# Altium PCB Grabber.PCBDOC (part 5 of 5)
Units mm, origin at the board's own origin, x right, y up, seen from the top; angles counter-clockwise.
Board outline 72.5 x 100 mm, 4 copper layers (TopLayer, Internal Plane 2, Layer 1, Bottom Layer), stack 1.543 mm thick; 160 components, 116 nets, 692 pads, 242 vias.
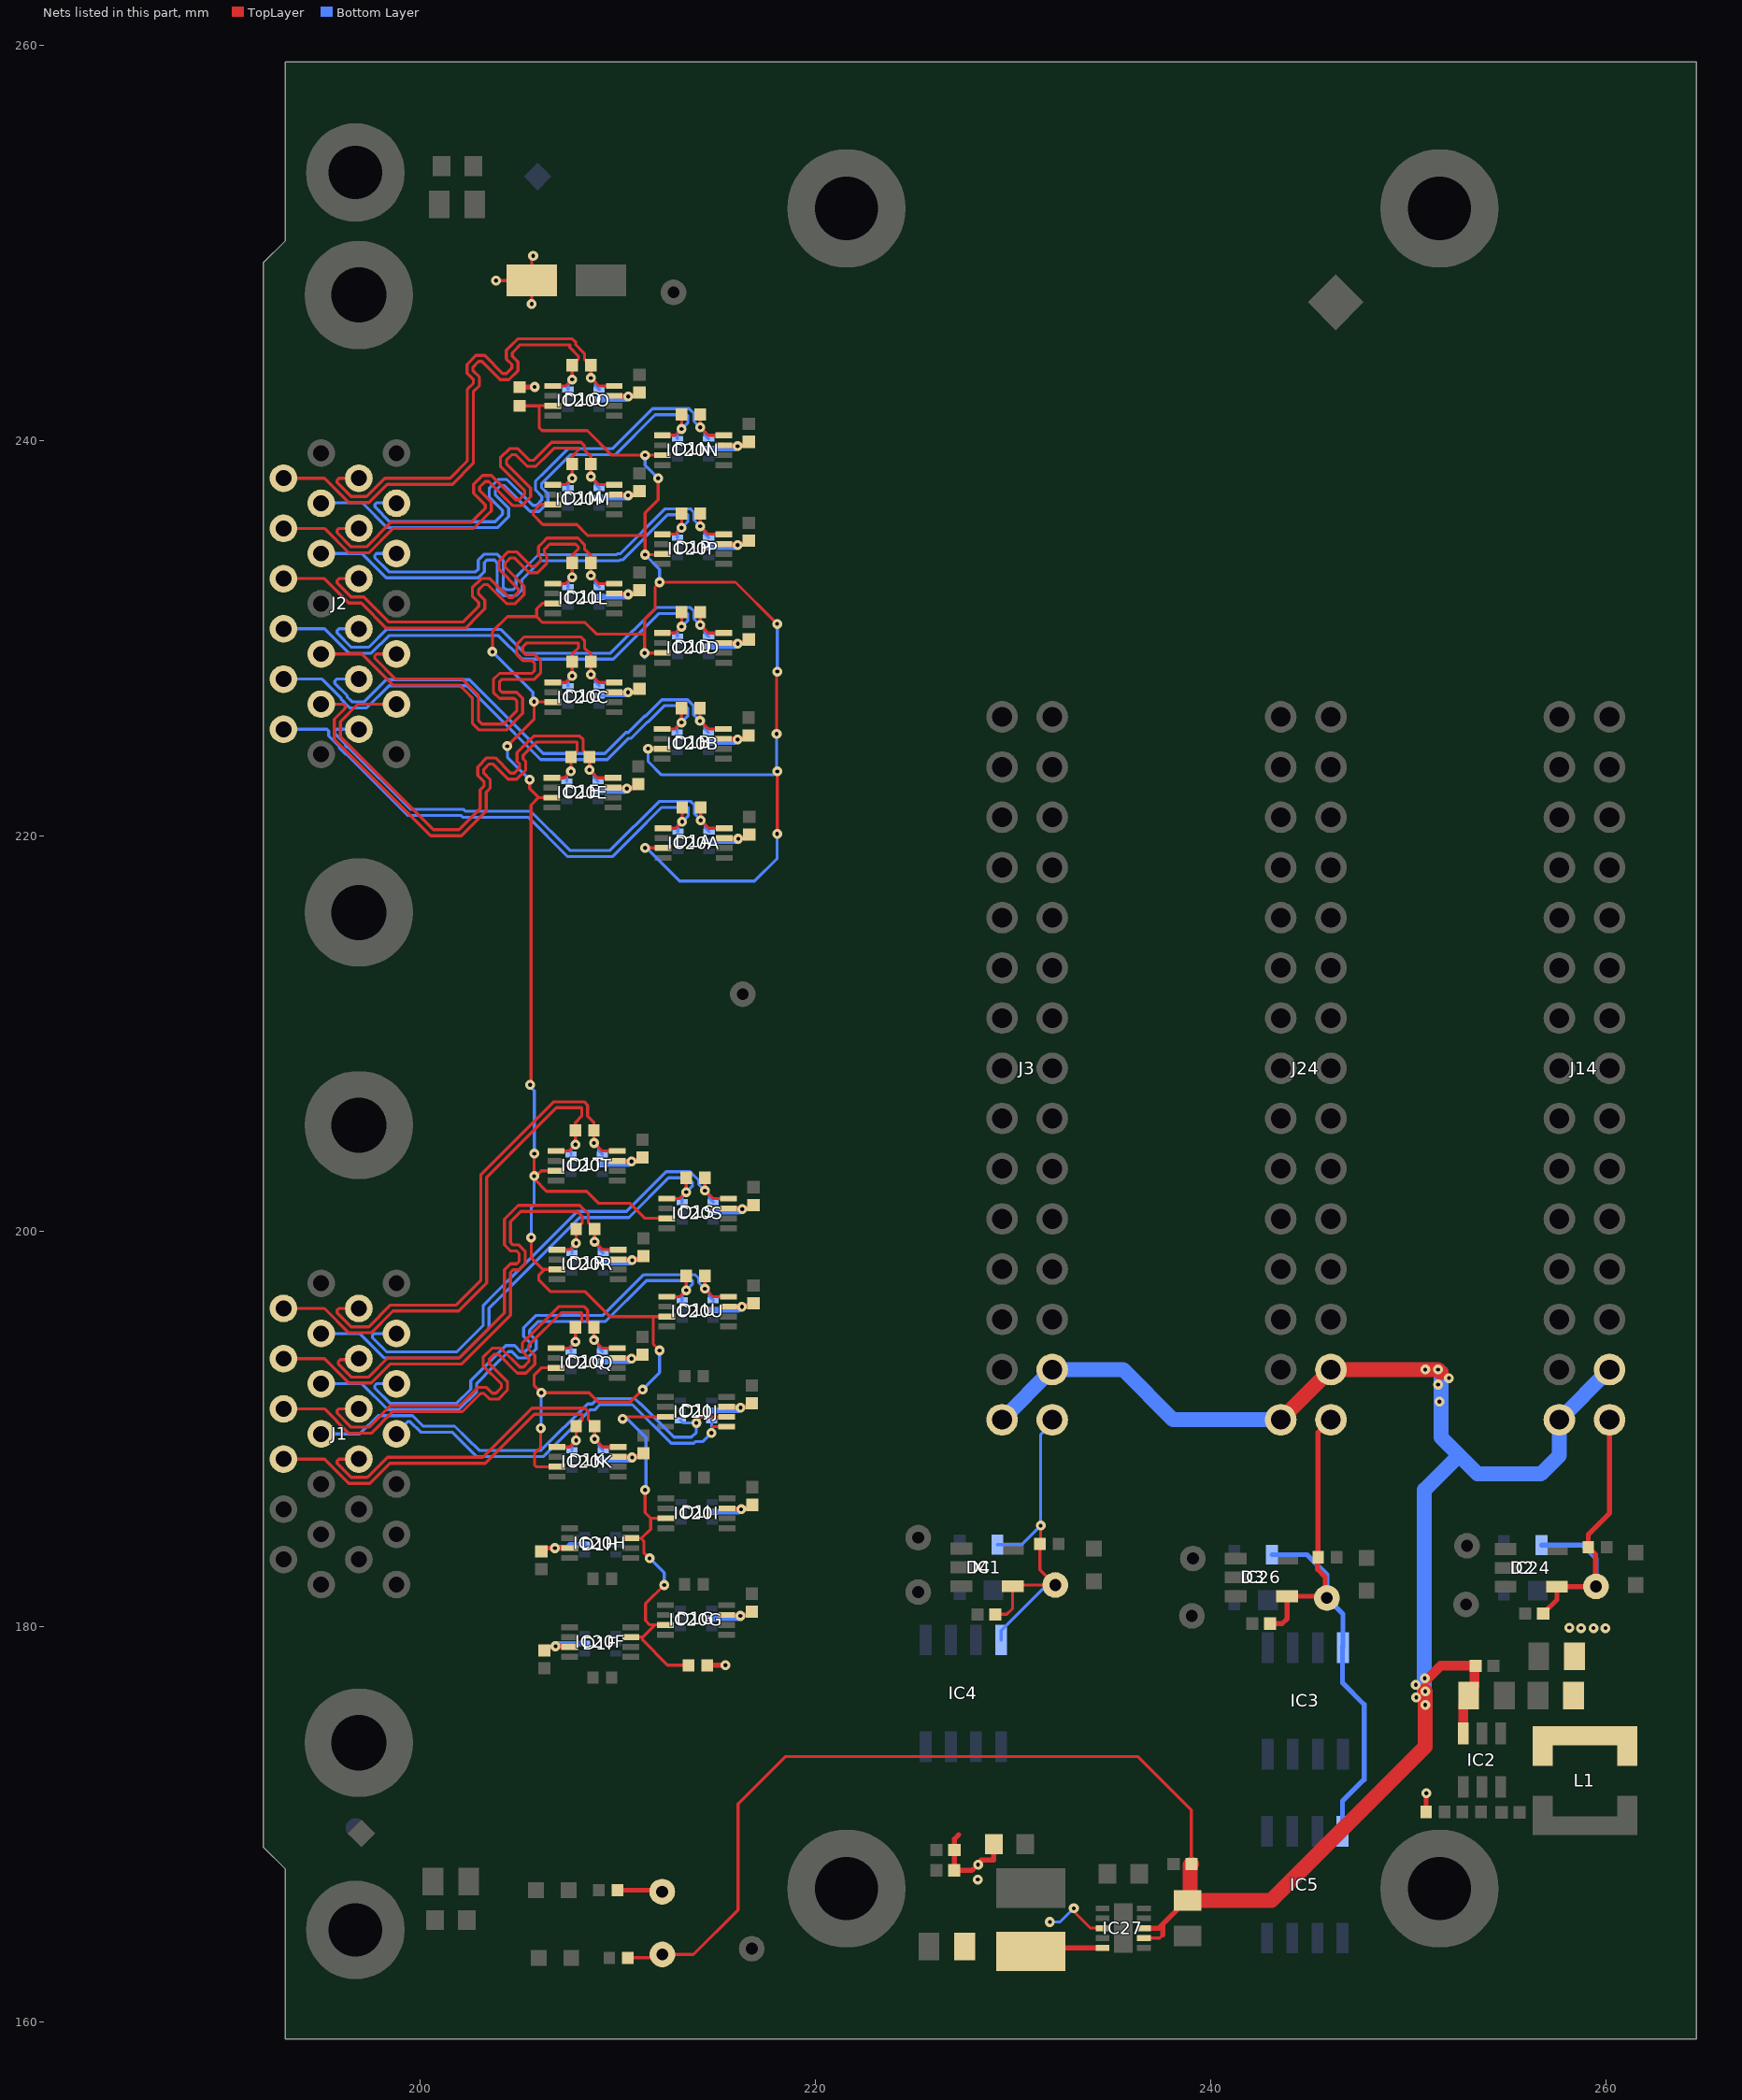
[diagram p6: the nets of this part, all layers, seen from the top]

## Via types
v1: diameter 0.5, hole 0.2, TopLayer to Bottom Layer, tented both sides, 242 vias

## Nets (pads, with @x,y where several pads share a name; then routed paths per layer and width w, separated by ;. In a path a pad name is that pad's centre, name@x,y a point inside that pad or via, vN(x,y) a via of type N, cw(c..) or ccw(c..) an arc to the next point about the centre after c; other vN are vias at no path point) (continued)
P3V3: B10.1 C7.2 C8.2 C47A.2 C47B.2 C47C.2 C47D.2 C47E.2 C47F.2 C47G.2 C47H.2 C47I.2 C47J.2 C47K.2 C47L.2 C47M.2 C47N.2 C47O.2 C47P.2 C47Q.2 C47R.2 C47S.2 C47T.2 C47U.2 C59.2 C62.1 C65.2 C66.2 D1A.5 D1B.5 D1C.5 D1D.5 D1E.5 D1F.5 D1G.5 D1H.5 D1I.5 D1J.5 D1K.5 D1L.5 D1M.5 D1N.5 D1O.5 D1P.5 D1Q.5 D1R.5 D1S.5 D1T.5 D1U.5 IC20A.7 IC20B.7 IC20C.7 IC20D.7 IC20E.7 IC20F.7 IC20G.7 IC20H.7 IC20I.7 IC20J.7 IC20K.7 IC20L.7 IC20M.7 IC20N.7 IC20O.7 IC20P.7 IC20Q.7 IC20R.7 IC20S.7 IC20T.7 IC20U.7 IC27.8 IC27.10 L1.2 L2.2 R2.1 R8.1 R9.1 R10.2 R121.2 | length 82.2
  TopLayer w0.152: v1(203.866,248.107) C62.1@205.666,248.107 ; v1(205.666,246.924) C62.1@205.666,248.107 ; v1(205.74,249.357) 205.666,249.284 C62.1@205.666,248.107 ; IC20C.7@209.842,227.273 209.844,227.275 210.539,227.275 v1(210.541,227.276) 210.94,227.276 210.942,227.273 C47C.2@211.117,227.448 ; v1(233.092,165.756) 233.092,165.607 233.942,164.756 IC27.8@234.542,164.756
  TopLayer w0.254: R8.1@205.054,242.71 205.803,242.71 v1(205.816,242.723) ; C47H.2@206.154,183.82 206.314,183.98 v1(206.838,183.98) IC20H.7@207.551,183.98 ; C47F.2@206.31,178.805 206.485,178.98 206.485,178.976 206.493,178.968 206.826,178.968 v1(206.873,179.015) 206.89,178.998 207.568,178.998 IC20F.7@207.585,178.98 ; IC20E.7@209.777,222.448 209.8,222.425 210.455,222.425 v1(210.478,222.402) 210.525,222.449 210.876,222.449 210.877,222.448 C47E.2@211.052,222.623 ; IC20L.7@209.842,232.273 209.865,232.25 210.52,232.25 v1(210.543,232.227) 210.59,232.274 210.941,232.274 210.942,232.273 C47L.2@211.117,232.448 ; IC20M.7@209.842,237.28 209.865,237.257 210.52,237.257 v1(210.543,237.234) 210.59,237.281 210.941,237.281 210.942,237.28 C47M.2@211.117,237.455 ; IC20O.7@209.842,242.273 209.86,242.256 210.538,242.256 v1(210.555,242.239) 210.602,242.286 210.934,242.286 210.942,242.278 210.942,242.273 C47O.2@211.117,242.448 ; IC20Q.7@210.002,193.598 211.102,193.598 C47Q.2@211.277,193.773 ; IC20T.7@210.002,203.572 210.02,203.555 210.698,203.555 v1(210.715,203.538) 210.762,203.585 211.094,203.585 211.102,203.577 211.102,203.572 C47T.2@211.277,203.747 ; R2.1@210.005,166.675 212.191,166.675 B10.1@212.267,166.599 ; IC20K.7@210.037,188.599 210.055,188.582 210.733,188.582 v1(210.75,188.565) 210.797,188.612 211.129,188.612 211.137,188.604 211.137,188.599 C47K.2@211.312,188.774 ; IC20R.7@210.037,198.581 210.055,198.564 210.733,198.564 v1(210.75,198.547) 210.797,198.594 211.129,198.594 211.137,198.586 211.137,198.581 C47R.2@211.312,198.756 ; R9.1@214.547,178.054 v1(215.468,178.054) ; IC20B.7@215.367,224.923 215.385,224.906 216.063,224.906 v1(216.08,224.889) 216.127,224.936 216.459,224.936 216.467,224.928 216.467,224.923 C47B.2@216.642,225.098 ; IC20D.7@215.377,229.773 215.395,229.756 216.073,229.756 v1(216.09,229.739) 216.137,229.786 216.469,229.786 216.477,229.778 216.477,229.773 C47D.2@216.652,229.948 ; IC20P.7@215.377,234.773 215.4,234.75 216.055,234.75 v1(216.078,234.727) 216.125,234.774 216.476,234.774 216.477,234.773 C47P.2@216.652,234.948 ; IC20N.7@215.377,239.773 215.4,239.75 216.055,239.75 v1(216.078,239.727) 216.125,239.774 216.476,239.774 216.477,239.773 C47N.2@216.652,239.948 ; IC20A.7@215.402,219.899 215.42,219.882 216.098,219.882 v1(216.115,219.865) 216.162,219.912 216.494,219.912 216.502,219.904 216.502,219.899 C47A.2@216.677,220.074 ; IC20G.7@215.527,180.598 215.55,180.575 216.205,180.575 v1(216.228,180.552) 216.275,180.599 216.626,180.599 216.627,180.598 C47G.2@216.802,180.773 ; IC20J.7@215.534,191.124 215.557,191.101 216.212,191.101 v1(216.235,191.078) 216.282,191.125 216.633,191.125 216.634,191.124 C47J.2@216.809,191.299 ; IC20I.7@215.562,185.991 215.585,185.968 216.24,185.968 v1(216.263,185.945) 216.31,185.992 216.661,185.992 216.662,185.991 C47I.2@216.837,186.166 ; IC20U.7@215.612,196.198 215.617,196.194 216.302,196.194 v1(216.306,196.19) 216.353,196.237 216.704,196.237 216.712,196.229 216.712,196.198 C47U.2@216.887,196.373 ; IC20S.7@215.612,201.164 215.63,201.147 216.308,201.147 v1(216.325,201.13) 216.372,201.177 216.704,201.177 216.712,201.169 216.712,201.164 C47S.2@216.887,201.339 ; C59.2@227.042,167.681 C59.2@227.052,167.681 ; 227.279,169.488 227.052,169.26 C65.2@227.052,168.706 C59.2@227.052,167.681 ; 227.99,167.731 227.94,167.681 C59.2@227.052,167.681 ; v1(228.251,167.962) 228.251,168.029 228.405,168.183 228.405,168.207 229.042,168.207 R121.2@229.042,169.006 ; L2.2@230.911,163.576 231.092,163.756 IC27.10@234.542,163.756 ; R10.2@250.914,170.637 250.92,170.644 250.92,171.571 v1(250.927,171.577)
  Bottom Layer w0.152: D1C.5@209.082,227.098 210.391,227.098 210.541,227.248 v1(210.541,227.276) ; v1(231.885,165.066) 232.402,165.066 v1(233.092,165.756)
  Bottom Layer w0.254: v1(206.838,183.98) 206.885,184.027 207.468,184.027 207.596,184.155 D1H.5@208.345,184.155 ; v1(206.873,179.015) 207.013,179.155 D1F.5@208.345,179.155 ; D1E.5@209.017,222.273 210.349,222.273 v1(210.478,222.402) ; D1L.5@209.082,232.098 210.414,232.098 v1(210.543,232.227) ; D1M.5@209.082,237.105 210.414,237.105 v1(210.543,237.234) ; D1O.5@209.082,242.098 210.414,242.098 v1(210.555,242.239) ; D1Q.5@209.242,193.423 210.574,193.423 v1(210.715,193.564) ; D1T.5@209.242,203.397 210.574,203.397 v1(210.715,203.538) ; D1K.5@209.277,188.424 210.609,188.424 v1(210.75,188.565) ; D1R.5@209.277,198.406 210.609,198.406 v1(210.75,198.547) ; D1B.5@214.607,224.748 215.939,224.748 v1(216.08,224.889) ; D1D.5@214.617,229.598 215.949,229.598 v1(216.09,229.739) ; D1P.5@214.617,234.598 215.949,234.598 v1(216.078,234.727) ; D1N.5@214.617,239.598 215.949,239.598 v1(216.078,239.727) ; D1A.5@214.642,219.724 215.974,219.724 v1(216.115,219.865) ; D1G.5@214.767,180.423 216.099,180.423 v1(216.228,180.552) ; D1J.5@214.774,190.949 216.106,190.949 v1(216.235,191.078) ; D1I.5@214.802,185.816 216.134,185.816 v1(216.263,185.945) ; D1U.5@214.852,196.023 216.14,196.023 v1(216.306,196.19) ; D1S.5@214.852,200.989 216.184,200.989 v1(216.325,201.13)
  other v1: 228.232,167.215 258.748,179.931 259.383,179.931 259.993,179.931 258.164,179.957
P3V3_MP0: B16.1 C58.2 D2.4 IC24.4 J14.30 R7.1 | length 17.1
  TopLayer w0.254: C58.2@256.838,180.67 257.535,181.368 IC24.4@257.535,182.032 259.502,182.032 B16.1@259.512,182.042 259.489,182.042 259.489,183.661 R7.1@259.118,184.032 259.118,184.671 260.198,185.75 J14.30@260.198,190.475
  Bottom Layer w0.254: D2.4@256.76,184.132 258.839,184.132 259.512,183.459 B16.1@259.512,182.042
P3V3_MP1: B8.1 C64.2 D3.4 IC3.8 IC5.8 IC26.4 J24.30 R4.1 | length 30.9
  TopLayer w0.254: C64.2@243.02,180.162 243.637,180.162 243.889,180.414 IC26.4@243.889,181.547 245.808,181.547 245.808,182.52 245.423,182.905 245.423,183.486 R4.1@245.453,183.516 245.453,189.827 J24.30@246.101,190.475
  Bottom Layer w0.254: D3.4@243.114,183.647 244.883,183.647 245.897,182.632 B8.1@245.897,181.458 246.71,180.645 IC3.8@246.71,178.951 ; IC5.8@246.685,169.654 246.685,171.181 247.777,172.273 247.777,176.073 246.685,177.165 IC3.8@246.685,179.019
P3V3_MP2: B6.1 C3.2 D4.4 IC1.4 IC4.8 J3.30 R3.1 | length 19.8
  TopLayer w0.152: C3.2@229.126,180.631 229.703,180.631 230.002,180.93 IC1.4@230.002,182.057 230.057,182.113 B6.1@232.156,182.113 231.381,182.888 R3.1@231.381,184.19 231.419,184.228 v1(231.419,185.116)
  Bottom Layer w0.152: D4.4@229.227,184.157 230.46,184.157 v1(231.419,185.116) 231.419,189.73 232.004,190.315 J3.30@232.004,190.475 ; IC4.8@229.413,179.339 229.413,179.814 231.492,181.893 231.855,181.893 B6.1@231.978,182.016
P12V0: B11.1 C5.2 C6.2 C67.2 C68.2 IC2.3 IC27.2 IC27.3 J3.28 J3.29 J14.28 J14.29 J24.28 J24.29 R1.2 | length 124.1
  TopLayer w0.152: R1.2@210.532,163.256 212.11,163.256 B11.1@212.277,163.424 213.849,163.424 216.103,165.678 216.103,171.039 218.496,173.431 236.347,173.431 239.042,170.736 C67.2@239.042,168.006 ; IC27.2@236.642,164.256 237.442,164.256 237.592,164.407
  TopLayer w0.254: IC27.3@236.642,164.756 237.393,164.756 237.592,164.956 ; 237.592,164.407 237.592,164.956 ; C68.2@238.842,166.156 238.793,166.156 237.592,164.956
  TopLayer w0.508: v1@250.952,177.368 251.003,177.368 251.663,178.029 C5.2@253.423,178.029 253.367,177.973 253.367,176.997 253.162,176.792 C6.2@253.162,176.759 ; IC2.3@252.796,174.603 252.796,176.076 253.06,176.341 C6.2@253.06,176.505
  TopLayer w0.762: C67.2@239.042,168.006 238.986,167.95 238.986,166.3 C68.2@238.842,166.156 243.093,166.156 250.876,173.939 v1(250.876,176.047) v1(250.876,176.733) ; J24.29@243.561,190.475 J24.28@246.101,193.015 v1(251.516,193.015) v1@251.668,192.862
  Bottom Layer w0.762: J3.29@229.464,190.475 J3.28@232.004,193.015 235.585,193.015 238.125,190.475 J24.29@243.561,190.475 ; v1@250.825,176.733 250.825,186.924 252.577,188.676 ; v1@251.668,192.862 251.668,189.585 252.577,188.676 ; J14.28@260.198,193.015 J14.29@257.658,190.475 257.658,188.671 256.718,187.731 253.522,187.731 252.577,188.676
  other v1: 250.419,176.428 250.393,177.063 250.85,177.394 251.587,191.389 251.516,192.253 252.07,192.583 250.876,193.015
RX_EN: IC20A.3 IC20B.3 IC20C.3 IC20D.3 IC20E.3 IC20K.3 IC20L.3 IC20M.3 IC20N.3 IC20O.3 IC20P.3 IC20Q.3 IC20R.3 IC20S.3 IC20T.3 IC20U.3 R8.2 | length 146.8
  TopLayer w0.152: v1(203.678,229.323) 203.678,230.341 204.442,231.104 205.916,231.104 ; v1(204.433,224.548) 205.783,225.898 v1(205.783,226.798) 205.795,226.786 206.73,226.786 IC20C.3@206.742,226.773 ; R8.2@205.054,241.77 206.057,241.77 ; v1(205.562,222.86) 205.562,222.405 206.018,221.948 ; v1(205.592,207.416) 205.638,207.462 205.638,221.568 206.018,221.948 ; v1(205.642,199.695) 205.642,198.675 206.236,198.081 206.327,198.081 ; v1(205.795,203.937) 205.793,203.935 205.793,202.802 v1(205.792,202.8) ; v1(206.125,190.043) 206.125,189.085 205.81,188.77 205.81,188.189 205.9,188.099 IC20K.3@206.937,188.099 ; IC20E.3@206.677,221.948 206.018,221.948 ; IC20L.3@206.742,231.773 206.193,231.773 205.916,231.496 205.916,231.104 ; IC20M.3@206.742,236.78 206.108,236.78 205.74,236.412 205.74,236.255 206.232,235.763 207.95,235.763 208.509,235.204 211.404,235.204 ; IC20O.3@206.742,241.773 206.061,241.773 206.057,241.77 ; IC20Q.3@206.902,193.098 206.154,193.098 205.791,192.735 205.791,192.205 v1(206.154,191.841) 208.564,191.841 209.042,191.364 210.642,191.364 v1(211.277,191.999) ; IC20T.3@206.902,203.072 206.158,203.072 205.886,202.8 v1(205.792,202.8) ; IC20R.3@206.937,198.081 206.327,198.081 ; v1(211.404,219.405) 211.41,219.399 IC20A.3@212.302,219.399 ; v1(211.557,224.423) IC20B.3@212.267,224.423 ; v1(212.065,238.105) 212.065,237.007 211.404,236.347 211.404,235.204 ; v1(212.141,193.98) 211.816,194.305 211.816,195.642 211.76,195.698 ; IC20D.3@212.264,229.26 v1(211.379,229.26) 211.379,230.226 ; IC20P.3@212.277,234.273 212.243,234.239 v1(211.404,234.239) 211.404,235.204 ; IC20N.3@212.277,239.273 211.41,239.273 v1(211.404,239.268) 209.728,239.268 208.483,240.513 206.197,240.513 206.042,240.667 206.042,241.755 206.057,241.77 ; IC20U.3@212.512,195.698 211.76,195.698 ; IC20S.3@212.512,200.664 211.4,200.664 210.642,201.422 209.067,201.422 208.458,202.032 206.421,202.032 205.792,202.661 v1(205.792,202.8) ; v1(218.059,225.171) 218.059,228.29 v1(218.092,228.323) ; v1(218.084,220.116) 218.088,220.12 218.088,223.269 v1(218.092,223.273) ; v1(218.084,230.734) 215.976,232.842 v1(212.141,232.842) 211.912,232.613 211.912,231.507 211.379,230.974 211.379,230.226 ; 205.916,231.104 206.21,230.81 208.356,230.81 208.94,230.226 211.379,230.226 ; 206.327,198.081 206.019,197.773 206.019,197.561 206.629,196.952 208.382,196.952 209.635,195.698 211.76,195.698
  Bottom Layer w0.152: v1(203.678,229.323) 205.725,227.277 205.725,226.856 v1(205.783,226.798) ; v1(204.433,224.548) 204.446,224.536 204.446,223.976 v1(205.562,222.86) ; v1(205.592,207.416) 205.592,207.322 205.795,207.12 v1(205.795,203.937) ; v1(205.642,199.695) 205.642,201.206 205.792,201.356 v1(205.792,202.8) ; v1(206.125,190.043) 206.14,190.057 206.14,191.827 v1(206.154,191.841) ; v1(211.277,191.999) 212.141,192.862 v1(212.141,193.98) ; v1@211.379,229.026 v1(211.379,229.26) ; v1(211.404,219.405) 211.48,219.405 213.157,217.729 216.941,217.729 218.084,218.872 v1(218.084,220.116) ; v1(211.404,234.239) 212.141,233.502 v1(212.141,232.842) ; v1(211.404,239.268) 211.404,238.766 v1(212.065,238.105) ; v1(211.557,224.423) 211.557,223.779 212.237,223.098 217.917,223.098 v1(218.092,223.273) 218.059,223.307 v1(218.059,225.171) ; v1(218.084,230.734) 218.088,230.73 218.088,228.327 v1(218.092,228.323)
SERRX_N: D1K.3 IC20K.1 J1.19 R131K.1 | length 20.2
  TopLayer w0.152: J1.19@193.111,188.486 195.177,188.486 196.41,187.253 197.48,187.253 198.495,188.268 203.319,188.268 205.808,190.756 208.23,190.756 208.23,190.467 R131K.1@207.912,190.149 v1(207.912,189.424) 207.587,189.099 IC20K.1@206.937,189.099
  Bottom Layer w0.152: D1K.3@207.697,188.924 207.697,189.209 v1(207.912,189.424)
SERRX_P: D1K.4 IC20K.8 J1.6 R131K.2 | length 19.4
  TopLayer w0.152: J1.6@196.921,188.486 195.913,188.486 195.823,188.397 195.823,188.271 196.536,187.558 197.354,187.558 198.369,188.573 203.193,188.573 205.681,191.061 208.356,191.061 208.535,190.883 208.535,190.467 R131K.2@208.852,190.149 v1(208.852,189.503) 209.256,189.099 IC20K.8@210.037,189.099
  Bottom Layer w0.152: v1(208.852,189.503) 209.087,189.268 209.087,189.114 D1K.4@209.277,188.924
SERTX_N: D1J.6 IC20J.5 J1.7 | length 20.7
  TopLayer w0.152: v1(214.757,189.808) 214.757,190.022 214.86,190.124 IC20J.5@215.534,190.124
  Bottom Layer w0.152: J1.7@198.826,189.756 198.826,189.817 199.389,190.38 199.515,190.38 200.051,189.845 201.643,189.845 202.296,189.192 202.296,189.188 202.865,188.62 206.264,188.62 208.616,190.972 208.852,190.972 209.116,191.237 210.769,191.237 212.719,189.287 213.873,189.287 213.962,189.376 214.325,189.376 v1(214.757,189.808) 214.774,189.825 D1J.6@214.774,190.449
SERTX_P: D1J.1 IC20J.6 J1.20 | length 25.1
  TopLayer w0.152: v1(213.995,190.316) 213.995,190.385 214.234,190.624 IC20J.6@215.534,190.624
  Bottom Layer w0.152: J1.20@195.016,189.756 196.964,189.756 197.893,190.685 199.642,190.685 200.177,190.15 200.583,190.15 201.77,190.15 202.422,189.498 202.424,189.498 ; 202.425,189.497 203.004,188.924 206.137,188.924 208.49,191.277 208.725,191.277 208.99,191.541 210.895,191.541 211.16,191.277 211.186,191.277 212.871,189.591 213.747,189.591 213.995,189.84 v1(213.995,190.316) 213.327,190.316 D1J.1@213.194,190.449
TX_EN: IC20F.3 IC20G.3 IC20H.3 IC20I.3 IC20J.3 R9.2 | length 21.1
  TopLayer w0.152: v1(210.27,190.525) 210.369,190.624 IC20J.3@212.434,190.624 ; IC20F.3@210.685,179.48 211.276,179.48 ; IC20H.3@210.685,184.48 211.227,184.48 ; v1(211.404,186.919) 211.404,185.776 211.688,185.491 ; v1(211.633,183.465) 211.339,183.759 211.339,184.337 211.227,184.45 211.227,184.48 ; v1(212.369,182.113) 211.43,181.173 211.43,180.315 211.646,180.098 211.894,180.098 ; IC20G.3@212.427,180.098 211.894,180.098 ; IC20I.3@212.462,185.491 211.688,185.491 ; R9.2@213.607,178.054 212.547,178.054 211.276,179.326 211.276,179.48 ; 211.227,184.48 211.688,184.942 211.688,185.491 ; 211.276,179.48 211.894,180.098
  Bottom Layer w0.152: v1(210.27,190.525) 210.505,190.525 211.455,189.576 211.455,186.969 v1(211.404,186.919) ; v1(211.633,183.465) 212.369,182.729 v1(212.369,182.113)
X0_N: D1T.3 IC20T.1 J1.25 R131T.1 | length 27.1
  TopLayer w0.152: J1.25@193.111,196.106 195.177,196.106 196.41,194.873 197.549,194.873 198.649,195.972 201.973,195.972 203.394,197.393 203.394,202.737 206.914,206.256 208.195,206.256 208.195,205.826 207.877,205.509 R131T.1@207.877,205.122 v1(207.877,204.397) 207.552,204.072 IC20T.1@206.902,204.072
  Bottom Layer w0.152: D1T.3@207.662,203.897 207.662,204.182 v1(207.877,204.397)
X0_P: D1T.4 IC20T.8 J1.12 R131T.2 | length 26.3
  TopLayer w0.152: J1.12@196.921,196.106 195.913,196.106 195.823,196.017 195.823,195.891 196.536,195.178 197.423,195.178 198.522,196.277 201.847,196.277 203.09,197.519 203.09,202.863 206.788,206.561 208.321,206.561 208.5,206.383 208.5,205.826 208.817,205.509 R131T.2@208.817,205.122 v1(208.817,204.476) 209.221,204.072 IC20T.8@210.002,204.072
  Bottom Layer w0.152: v1(208.817,204.476) 209.052,204.241 209.052,204.087 D1T.4@209.242,203.897
X1_N: D1S.3 IC20S.1 J1.24 R131S.1 | length 26.8
  TopLayer w0.152: IC20S.1@212.512,201.664 213.162,201.664 v1(213.487,201.989) R131S.1@213.487,202.714
  Bottom Layer w0.152: J1.24@195.016,194.836 196.964,194.836 197.924,193.876 198.198,193.603 202.008,193.603 203.51,195.105 203.51,196.119 204.062,196.671 205.148,197.758 208.1,200.71 210.588,200.71 212.592,202.714 213.555,202.714 213.805,202.464 213.805,202.307 v1(213.487,201.989) 213.272,201.774 D1S.3@213.272,201.489
X1_P: D1S.4 IC20S.8 J1.11 R131S.2 | length 26.1
  TopLayer w0.152: R131S.2@214.427,202.714 v1(214.427,202.068) 214.831,201.664 IC20S.8@215.612,201.664
  Bottom Layer w0.152: J1.11@198.826,194.836 197.7,194.836 197.611,194.747 197.611,194.621 198.324,193.908 201.882,193.908 203.205,195.231 203.205,196.246 203.846,196.886 205.022,198.063 207.974,201.014 210.461,201.014 212.466,203.019 213.681,203.019 214.11,202.591 214.11,202.386 v1(214.427,202.068) 214.662,201.833 214.662,201.679 D1S.4@214.852,201.489
X2_N: D1R.3 IC20R.1 J1.23 R131R.1 | length 26.3
  TopLayer w0.152: J1.23@193.111,193.566 195.177,193.566 196.41,192.333 197.549,192.333 198.515,193.298 202.135,193.298 204.592,195.756 204.592,197.371 204.592,197.926 204.723,198.056 205.028,198.056 205.337,198.365 205.337,199.009 205.028,199.318 204.723,199.318 204.592,199.449 204.592,199.614 204.592,200.496 205.111,201.014 207.972,201.014 208.23,200.756 208.23,200.449 R131R.1@207.912,200.131 v1(207.912,199.406) 207.587,199.081 IC20R.1@206.937,199.081
  Bottom Layer w0.152: D1R.3@207.697,198.906 207.697,199.191 v1(207.912,199.406)
X2_P: D1R.4 IC20R.8 J1.10 R131R.2 | length 25.3
  TopLayer w0.152: J1.10@196.921,193.566 196.875,193.52 195.992,193.52 195.886,193.414 195.886,193.288 196.536,192.638 197.423,192.638 198.388,193.603 202.008,193.603 204.288,195.882 204.288,197.371 204.288,198.052 204.597,198.361 204.902,198.361 205.033,198.492 205.033,198.883 204.902,199.014 204.597,199.014 204.288,199.323 204.288,199.614 204.288,200.622 204.985,201.319 208.098,201.319 208.535,200.883 208.535,200.449 R131R.2@208.852,200.131 v1(208.852,199.485) 209.256,199.081 IC20R.8@210.037,199.081
  Bottom Layer w0.152: v1(208.852,199.485) 209.087,199.25 209.087,199.096 D1R.4@209.277,198.906
X3_N: D1Q.3 IC20Q.1 J1.21 R131Q.1 | length 25.7
  TopLayer w0.152: J1.21@193.111,191.026 195.177,191.026 196.41,189.793 197.549,189.793 198.641,190.885 202.154,190.885 202.199,190.93 203.073,191.804 203.257,191.804 203.546,191.515 203.983,191.515 204.438,191.971 204.438,192.408 203.513,193.332 203.513,193.517 203.79,193.794 203.974,193.794 204.936,192.832 205.373,192.832 205.829,193.287 205.829,193.724 205.503,194.05 205.503,194.234 205.62,194.351 207.16,195.891 208.195,195.891 208.195,195.466 R131Q.1@207.877,195.148 v1(207.877,194.423) 207.552,194.098 IC20Q.1@206.902,194.098
  Bottom Layer w0.152: D1Q.3@207.662,193.923 207.662,194.208 v1(207.877,194.423)
X3_P: D1Q.4 IC20Q.8 J1.8 R131Q.2 | length 24.9
  TopLayer w0.152: J1.8@196.921,191.026 195.913,191.026 195.823,190.937 195.823,190.811 196.536,190.098 197.423,190.098 198.515,191.19 201.938,191.19 202.028,191.19 202.946,192.108 203.383,192.108 203.672,191.82 203.856,191.82 204.133,192.097 204.133,192.281 203.208,193.206 203.208,193.643 203.664,194.099 204.101,194.099 205.063,193.136 205.247,193.136 205.524,193.413 205.524,193.598 205.198,193.923 205.198,194.36 205.405,194.567 207.033,196.195 208.321,196.195 208.5,196.017 208.5,195.466 R131Q.2@208.817,195.148 v1(208.817,194.502) 209.221,194.098 IC20Q.8@210.002,194.098
  Bottom Layer w0.152: v1(208.817,194.502) 209.052,194.267 209.052,194.113 D1Q.4@209.242,193.923
XCLK_N: D1U.3 IC20U.1 J1.22 R131U.1 | length 26.6
  TopLayer w0.152: IC20U.1@212.512,196.698 213.162,196.698 v1(213.487,197.023) R131U.1@213.487,197.748
  Bottom Layer w0.152: J1.22@195.016,192.296 197.082,192.296 198.388,190.99 201.984,190.99 202.886,191.892 202.886,192.323 203.704,193.141 204.487,193.924 204.672,193.924 204.997,193.599 205.435,193.599 205.89,194.054 205.89,194.491 205.564,194.816 205.564,195.001 205.681,195.118 206.015,195.452 209.407,195.452 211.465,197.51 213.793,197.51 213.805,197.498 213.805,197.341 v1(213.487,197.023) 213.272,196.808 D1U.3@213.272,196.523
XCLK_P: D1U.4 IC20U.8 J1.9 R131U.2 | length 25.7
  TopLayer w0.152: R131U.2@214.427,197.748 v1(214.427,197.102) 214.831,196.698 IC20U.8@215.612,196.698
  Bottom Layer w0.152: J1.9@198.826,192.296 197.818,192.296 197.728,192.207 197.728,192.081 198.515,191.295 201.858,191.295 202.581,192.018 202.581,192.449 203.489,193.357 204.361,194.229 204.798,194.229 205.124,193.903 205.308,193.903 205.585,194.18 205.585,194.365 205.259,194.69 205.259,195.127 205.466,195.334 205.889,195.756 209.28,195.756 211.339,197.815 213.919,197.815 214.11,197.625 214.11,197.42 v1(214.427,197.102) 214.662,196.867 214.662,196.713 D1U.4@214.852,196.523
Y0_N: D1O.3 IC20O.1 J2.25 R131O.1 | length 26.9
  TopLayer w0.152: J2.25@193.111,238.106 195.177,238.106 196.41,236.873 197.432,236.873 198.359,237.801 201.663,237.801 202.713,238.851 202.713,242.363 202.713,242.477 203.023,242.787 203.023,243.224 202.697,243.549 202.697,243.734 202.974,244.011 203.158,244.011 204.077,243.093 204.514,243.093 204.969,243.548 204.969,243.985 204.687,244.267 204.687,244.451 204.804,244.568 205.092,244.856 207.592,244.856 207.592,244.726 208.035,244.283 208.035,244.141 R131O.1@207.717,243.823 v1(207.717,243.098) 207.392,242.773 IC20O.1@206.742,242.773
  Bottom Layer w0.152: D1O.3@207.502,242.598 207.502,242.883 v1(207.717,243.098)
Y0_P: D1O.4 IC20O.8 J2.12 R131O.2 | length 26.1
  TopLayer w0.152: J2.12@196.921,238.106 195.913,238.106 195.823,238.017 195.823,237.891 196.536,237.178 197.306,237.178 198.233,238.105 201.537,238.105 202.408,238.977 202.408,242.604 202.441,242.636 202.718,242.913 202.718,243.098 202.392,243.423 202.392,243.86 202.848,244.315 203.285,244.315 204.203,243.397 204.387,243.397 204.664,243.674 204.664,243.859 204.382,244.14 204.382,244.577 204.589,244.784 204.966,245.161 207.719,245.161 207.897,244.983 207.897,244.852 208.34,244.41 208.34,244.141 R131O.2@208.657,243.823 v1(208.657,243.177) 209.061,242.773 IC20O.8@209.842,242.773
  Bottom Layer w0.152: v1(208.657,243.177) 208.892,242.942 208.892,242.788 D1O.4@209.082,242.598
Y1_N: D1N.3 IC20N.1 J2.24 R131N.1 | length 28.5
  TopLayer w0.152: IC20N.1@212.277,240.273 212.927,240.273 v1(213.252,240.598) R131N.1@213.252,241.323
  Bottom Layer w0.152: J2.24@195.022,236.869 197.088,236.869 198.353,235.603 203.939,235.603 204.292,235.956 204.498,236.162 204.498,236.599 203.821,237.277 203.821,237.461 204.098,237.738 204.283,237.738 205.596,236.424 206.033,236.424 206.488,236.88 206.488,237.317 206.163,237.642 206.163,237.827 206.604,238.268 207.63,239.294 209.881,239.294 211.91,241.323 213.503,241.323 213.57,241.256 213.57,240.916 v1(213.252,240.598) 213.037,240.383 D1N.3@213.037,240.098
Y1_P: D1N.4 IC20N.8 J2.11 R131N.2 | length 27.6
  TopLayer w0.152: R131N.2@214.192,241.323 v1(214.192,240.677) 214.596,240.273 IC20N.8@215.377,240.273
  Bottom Layer w0.152: J2.11@198.832,236.869 197.823,236.869 197.734,236.779 197.734,236.653 198.479,235.908 203.813,235.908 204.077,236.172 204.194,236.289 204.194,236.473 203.516,237.15 203.516,237.587 203.972,238.043 204.409,238.043 205.722,236.729 205.907,236.729 206.184,237.006 206.184,237.19 205.858,237.516 205.858,237.953 206.388,238.483 207.503,239.598 209.754,239.598 211.784,241.628 213.629,241.628 213.875,241.383 213.875,240.995 v1(214.192,240.677) 214.427,240.442 214.427,240.288 D1N.4@214.617,240.098
Y2_N: D1M.3 IC20M.1 J2.23 R131M.1 | length 26.8
  TopLayer w0.152: J2.23@193.111,235.566 195.177,235.566 196.41,234.333 197.432,234.333 198.667,235.569 202.739,235.569 203.418,236.247 203.625,236.454 203.625,236.891 203.035,237.481 203.035,237.665 203.311,237.942 203.496,237.942 204.722,236.716 205.159,236.716 205.615,237.171 205.615,237.608 204.388,238.834 204.388,239.019 204.665,239.296 204.85,239.296 205.44,238.706 205.877,238.706 206.484,239.314 206.794,239.623 208.035,239.623 208.035,239.534 207.717,239.217 R131M.1@207.717,238.83 v1(207.717,238.105) 207.392,237.78 IC20M.1@206.742,237.78
  Bottom Layer w0.152: D1M.3@207.502,237.605 207.502,237.89 v1(207.717,238.105)
Y2_P: D1M.4 IC20M.8 J2.10 R131M.2 | length 26
  TopLayer w0.152: J2.10@196.921,235.566 195.913,235.566 195.823,235.477 195.823,235.351 196.536,234.638 197.306,234.638 198.541,235.873 202.613,235.873 203.203,236.463 203.32,236.58 203.32,236.765 202.73,237.354 202.73,237.792 203.185,238.247 203.622,238.247 204.849,237.02 205.033,237.02 205.31,237.297 205.31,237.482 204.084,238.708 204.084,239.145 204.539,239.601 204.976,239.601 205.566,239.011 205.75,239.011 206.269,239.529 206.668,239.928 208.161,239.928 208.34,239.75 208.34,239.534 208.657,239.217 R131M.2@208.657,238.83 v1(208.657,238.184) 209.061,237.78 IC20M.8@209.842,237.78
  Bottom Layer w0.152: v1(208.657,238.184) 208.892,237.949 208.892,237.795 D1M.4@209.082,237.605
Y3_N: D1L.3 IC20L.1 J2.21 R131L.1 | length 26.4
  TopLayer w0.152: J2.21@193.111,233.026 195.177,233.026 196.41,231.793 197.045,231.793 198.315,230.523 202.318,230.523 203.013,231.217 203.295,231.5 203.295,231.937 202.97,232.263 202.97,232.447 203.247,232.724 203.431,232.724 204.393,231.762 204.83,231.762 205.286,232.217 205.286,232.654 204.324,233.616 204.324,233.801 204.6,234.078 204.785,234.078 205.533,233.33 205.97,233.33 206.425,233.785 206.425,234.222 206.314,234.334 206.314,234.518 206.431,234.635 206.569,234.773 207.885,234.773 208.035,234.623 208.035,234.527 207.717,234.21 R131L.1@207.717,233.823 v1(207.717,233.098) 207.392,232.773 IC20L.1@206.742,232.773
  Bottom Layer w0.152: D1L.3@207.502,232.598 207.502,232.883 v1(207.717,233.098)
Y3_P: D1L.4 IC20L.8 J2.8 R131L.2 | length 25.6
  TopLayer w0.152: J2.8@196.921,233.026 195.913,233.026 195.823,232.937 195.823,232.811 196.536,232.098 197.171,232.098 198.441,230.828 202.192,230.828 202.797,231.433 202.991,231.626 202.991,231.811 202.665,232.136 202.665,232.573 203.12,233.029 203.557,233.029 204.519,232.067 204.704,232.067 204.981,232.344 204.981,232.528 204.019,233.49 204.019,233.927 204.474,234.383 204.911,234.383 205.659,233.635 205.843,233.635 206.12,233.912 206.12,234.096 206.009,234.207 206.009,234.644 206.215,234.851 206.443,235.078 208.011,235.078 208.34,234.75 208.34,234.527 208.657,234.21 R131L.2@208.657,233.823 v1(208.657,233.177) 209.061,232.773 IC20L.8@209.842,232.773
  Bottom Layer w0.152: v1(208.657,233.177) 208.892,232.942 208.892,232.788 D1L.4@209.082,232.598
YCLK_N: D1P.3 IC20P.1 J2.22 R131P.1 | length 26.5
  TopLayer w0.152: IC20P.1@212.277,235.273 212.927,235.273 v1(213.252,235.598) R131P.1@213.252,236.323
  Bottom Layer w0.152: J2.22@195.016,234.296 197.082,234.296 198.315,233.063 202.665,233.063 202.957,233.063 203.266,233.372 203.266,233.833 203.396,233.963 203.788,233.963 203.918,233.833 203.918,232.472 204.227,232.163 204.871,232.163 205.18,232.472 205.18,232.985 205.529,233.334 206.129,233.934 210.095,233.934 210.137,233.976 210.264,233.976 212.545,236.256 213.57,236.256 213.57,235.916 v1(213.252,235.598) 213.037,235.383 D1P.3@213.037,235.098
YCLK_P: D1P.4 IC20P.8 J2.9 R131P.2 | length 25.5
  TopLayer w0.152: R131P.2@214.192,236.323 v1(214.192,235.677) 214.596,235.273 IC20P.8@215.377,235.273
  Bottom Layer w0.152: J2.9@198.826,234.296 197.818,234.296 197.728,234.207 197.728,234.081 198.441,233.368 202.665,233.368 202.831,233.368 202.961,233.498 202.961,233.959 203.27,234.268 203.914,234.268 204.223,233.959 204.223,232.598 204.353,232.468 204.745,232.468 204.875,232.598 204.875,233.111 205.529,233.765 206.003,234.239 209.969,234.239 210.011,234.281 210.138,234.281 212.419,236.561 213.696,236.561 213.875,236.383 213.875,235.995 v1(214.192,235.677) 214.427,235.442 214.427,235.288 D1P.4@214.617,235.098
Z0_N: D1D.3 IC20D.1 J2.19 R131D.1 | length 26
  TopLayer w0.152: IC20D.1@212.277,230.273 212.927,230.273 v1(213.252,230.598) R131D.1@213.252,231.323
  Bottom Layer w0.152: J2.19@193.111,230.486 195.177,230.486 196.41,229.253 197.549,229.253 198.441,230.145 203.989,230.145 205.182,228.952 209.788,228.952 212.092,231.256 213.57,231.256 213.57,230.916 v1(213.252,230.598) 213.037,230.383 D1D.3@213.037,230.098
Z0_P: D1D.4 IC20D.8 J2.6 R131D.2 | length 25.1
  TopLayer w0.152: R131D.2@214.192,231.323 v1(214.192,230.677) 214.596,230.273 IC20D.8@215.377,230.273
  Bottom Layer w0.152: J2.6@196.921,230.486 195.913,230.486 195.823,230.397 195.823,230.271 196.536,229.558 197.423,229.558 198.315,230.45 204.115,230.45 205.308,229.256 209.661,229.256 211.966,231.561 213.696,231.561 213.875,231.383 213.875,230.995 v1(214.192,230.677) 214.427,230.442 214.427,230.288 D1D.4@214.617,230.098
Z1_N: D1C.3 IC20C.1 J2.18 R131C.1 | length 26.1
  TopLayer w0.152: J2.18@195.016,229.216 197.082,229.216 198.658,227.64 202.025,227.64 202.291,227.373 ; 202.311,227.354 202.291,227.373 ; IC20C.1@206.742,227.773 207.392,227.773 v1(207.717,228.098) R131C.1@207.717,228.823 207.717,229.21 208.035,229.527 208.035,229.773 205.416,229.773 205.299,229.656 205.213,229.57 205.213,229.322 205.344,229.192 205.804,229.192 206.113,228.883 206.113,228.239 205.804,227.93 204.164,227.93 204.033,227.799 204.033,227.408 204.164,227.277 204.904,227.277 205.213,226.968 205.213,226.676 205.213,226.203 204.379,225.369 203.019,225.369 202.665,225.722 202.665,227 202.291,227.373
  Bottom Layer w0.152: D1C.3@207.502,227.598 207.502,227.883 v1(207.717,228.098)
Z1_P: D1C.4 IC20C.8 J2.5 R131C.2 | length 25.2
  TopLayer w0.152: J2.5@198.826,229.216 197.818,229.216 197.728,229.127 197.728,229.001 198.785,227.944 202.151,227.944 202.722,227.373 202.97,227.126 202.97,225.848 203.145,225.673 204.253,225.673 204.909,226.329 204.909,226.676 204.909,226.842 204.778,226.972 204.037,226.972 203.728,227.281 203.728,227.925 204.037,228.234 205.678,228.234 205.809,228.365 205.809,228.756 205.678,228.887 205.218,228.887 204.909,229.196 204.909,229.656 204.909,229.697 205.29,230.078 208.161,230.078 208.34,229.9 208.34,229.527 208.657,229.21 R131C.2@208.657,228.823 v1(208.657,228.177) 209.061,227.773 IC20C.8@209.842,227.773
  Bottom Layer w0.152: v1(208.657,228.177) 208.892,227.942 208.892,227.788 D1C.4@209.082,227.598
Z2_N: D1B.3 IC20B.1 J2.17 R131B.1 | length 27.6
  TopLayer w0.152: IC20B.1@212.267,225.423 212.917,225.423 v1(213.242,225.748) R131B.1@213.242,226.473
  Bottom Layer w0.152: J2.17@193.111,227.946 195.059,227.946 196.029,226.977 196.029,226.915 196.365,226.58 196.454,226.49 197.327,226.49 198.441,227.605 202.391,227.605 203.53,226.465 206.12,223.876 209.489,223.876 210.557,224.944 210.684,224.944 211.511,225.771 211.545,225.771 212.373,226.598 213.435,226.598 213.56,226.473 213.56,226.066 v1(213.242,225.748) 213.027,225.533 D1B.3@213.027,225.248
Z2_P: D1B.4 IC20B.8 J2.4 R131B.2 | length 26.9
  TopLayer w0.152: R131B.2@214.182,226.473 v1(214.182,225.827) 214.586,225.423 IC20B.8@215.367,225.423
  Bottom Layer w0.152: J2.4@196.921,227.946 195.795,227.946 195.706,227.857 195.706,227.731 196.334,227.103 196.334,227.042 196.58,226.795 197.201,226.795 198.315,227.91 202.517,227.91 206.246,224.18 209.363,224.18 210.431,225.248 210.557,225.248 211.385,226.076 211.419,226.076 212.247,226.903 213.561,226.903 213.865,226.6 213.865,226.145 v1(214.182,225.827) 214.417,225.592 214.417,225.438 D1B.4@214.607,225.248
Z3_N: D1A.3 IC20A.1 J2.15 R131A.1 | length 27.6
  TopLayer w0.152: IC20A.1@212.302,220.399 212.952,220.399 v1(213.277,220.724) R131A.1@213.277,221.449
  Bottom Layer w0.152: J2.15@193.111,225.406 195.312,225.406 195.401,225.317 195.401,225.065 195.944,224.522 195.944,224.459 196.265,224.138 196.328,224.138 199.422,221.044 202.095,221.044 202.185,220.955 205.487,220.955 207.468,218.973 209.762,218.973 210.709,219.92 212.238,221.449 213.595,221.449 213.595,221.042 v1(213.277,220.724) 213.062,220.509 D1A.3@213.062,220.224
Z3_P: D1A.4 IC20A.8 J2.2 R131A.2 | length 26.8
  TopLayer w0.152: R131A.2@214.217,221.449 v1(214.217,220.803) 214.621,220.399 IC20A.8@215.402,220.399
  Bottom Layer w0.152: J2.2@196.921,225.406 195.795,225.406 195.706,225.317 195.706,225.191 196.249,224.648 196.249,224.585 196.338,224.495 196.401,224.495 199.548,221.349 202.222,221.349 202.311,221.259 205.613,221.259 207.594,219.278 209.636,219.278 212.112,221.754 213.721,221.754 213.9,221.576 213.9,221.121 v1(214.217,220.803) 214.452,220.568 214.452,220.414 D1A.4@214.642,220.224
ZCLK_N: D1E.3 IC20E.1 J2.16 R131E.1 | length 25.6
  TopLayer w0.152: J2.16@195.016,226.676 196.142,226.676 196.231,226.587 196.231,226.461 195.688,225.917 195.688,224.896 200.562,220.022 202.111,220.022 203.36,221.271 203.36,222.222 203.567,222.428 203.567,222.865 203.241,223.191 203.241,223.375 203.518,223.652 203.702,223.652 204.472,222.883 204.909,222.883 205.364,223.338 205.364,223.775 205.231,223.908 205.231,224.093 205.783,224.644 205.895,224.756 207.97,224.756 207.97,224.316 R131E.1@207.652,223.998 v1(207.652,223.273) 207.327,222.948 IC20E.1@206.677,222.948
  Bottom Layer w0.152: D1E.3@207.437,222.773 207.437,223.058 v1(207.652,223.273)
ZCLK_P: D1E.4 IC20E.8 J2.3 R131E.2 | length 26.8
  TopLayer w0.152: J2.3@198.826,226.676 196.878,226.676 195.992,225.791 195.992,225.022 200.688,220.326 201.985,220.326 203.056,221.397 203.056,222.348 203.145,222.437 203.262,222.554 203.262,222.739 202.936,223.065 202.936,223.502 203.392,223.957 203.829,223.957 204.598,223.188 204.782,223.188 205.059,223.464 205.059,223.649 204.926,223.782 204.926,224.219 205.567,224.86 205.769,225.061 208.096,225.061 208.275,224.883 208.275,224.316 R131E.2@208.592,223.998 v1(208.592,223.352) 208.996,222.948 IC20E.8@209.777,222.948
  Bottom Layer w0.152: v1(208.592,223.352) 208.827,223.117 208.827,222.963 D1E.4@209.017,222.773
pads on no net: FTG21.FTG2 FTG22.1 FTG23.1 FTG24.1 IC1.5 IC2.5 IC3.1 IC3.2 IC3.3 IC3.7 IC4.1 IC4.2 IC4.3 IC4.7 IC5.1 IC5.2 IC5.3 IC5.7 IC24.5 IC26.5 IC27.4 IC27.7 J2.7 J2.20

## Polygon pours and split planes (outlines as drawn)
P3V3 on TopLayer "P3V3_L01_P001" (solid, remove dead copper, pour order 1): 257.607,175.895 257.048,175.336 256.311,175.336 255.905,174.93 255.905,174.015 262.484,174.015 262.484,179.4 261.391,180.492 258.064,180.492 257.607,180.035
P3V3 on TopLayer "TopLayer-P3V3" (solid, remove dead copper, pour order 0): 227.174,170.304 231.098,170.304 232.235,169.167 232.235,164.716 236.935,164.716 237.135,164.516 237.135,162.69 236.184,161.739 227.288,161.739 226.273,162.754 226.273,169.402
P3V3 on Internal Plane 2 (split plane): 264.082,159.667 193.703,159.667 193.703,167.756 193.693,167.856 193.664,167.952 193.617,168.04 193.553,168.117 192.603,169.068 192.603,248.795 193.553,249.745 193.617,249.823 193.664,249.911 193.693,250.007 193.703,250.106 193.703,258.646 264.082,258.646
GND on Layer 1 (split plane): 264.082,159.667 193.703,159.667 193.703,167.756 193.693,167.856 193.664,167.952 193.617,168.04 193.553,168.117 192.603,169.068 192.603,248.795 193.553,249.745 193.617,249.823 193.664,249.911 193.693,250.007 193.703,250.106 193.703,258.646 264.082,258.646

## Keep-outs
TopLayer:
  lines w0.1: 192.092,167.259 194.437,167.259 194.934,167.756 198.685,167.756 199.542,166.898 ; 193.909,251.079 194.742,251.079 195.224,250.596 198.272,250.596 199.288,251.612 ; 199.288,162.179 199.288,163.22 199.636,163.568 199.636,164.856 ; 199.288,256.159 199.288,255.157 199.784,254.661 199.784,254.152
Bottom Layer:
  lines w0.1: 192.092,167.259 194.437,167.259 194.934,167.756 198.685,167.756 199.636,166.805 199.636,163.568 199.288,163.22 199.288,162.179 ; 193.909,251.079 194.742,251.079 195.224,250.596 198.272,250.596 199.784,252.108 199.784,254.661 199.288,255.157 199.288,256.159
KeepOutLayer:
  lines w0.203: 192.092,167.259 192.092,251.079 ; 199.288,162.179 263.592,162.179 263.592,256.159 199.288,256.159

## Other copper
TopLayer:
  rectangle net P3V3: 261.315,174.142 262.23,174.803
  rectangle net P3V3: 258.648,174.803 259.334,175.362
  rectangle net P12V0: 249.987,175.717 251.308,177.673
  rectangle net P12V0: 250.571,191.135 252.4,193.497
Bottom Layer:
  rectangle net P12V0: 249.987,175.717 251.308,177.673
  rectangle net P12V0: 250.571,191.135 252.4,193.497

## Silkscreen, mask and mechanical layers (free items; w line width, h text height)
TopOverlay:
  drawing of 1239 lines, arcs and shapes, not listed
  text "Grabber  v1.1.3" at 211.988,255.397 h1.52
  text "GND" at 214.51,247.043 h1
  text "Y0" at 207.277,244.283 h1
  text "Y1" at 213.062,241.816 h1
  text "Y2" at 207.277,239.29 h1
  text "YCLK" at 212.065,237.007 h1
  text "Y3" at 207.277,234.283 h1
  text "EEM1" at 242.292,232.098 h1.52
  text "EEM0" at 256.248,231.773 h1.52
  text "EEM2" at 227.592,231.698 h1.52
  text "Z0" at 212.7,231.599 h1.02
  text "Z1" at 207.277,229.283 h1.02
  text "Z2" at 212.802,226.933 h1.02
  text "ZCLK" at 206.108,224.378 h1.02
  text "Z3" at 212.837,221.909 h1.02
  text "GND" at 218.592,211.506 h1
  text "X0" at 207.697,205.613 h1
  text "X1" at 213.385,203.251 h1
  text "X2" at 207.569,200.609 h1
  text "XCK" at 213.047,198.208 h1
  text "LVDS CH0...7 EEM-0" at 254.559,195.936 h1.02 r90
  text "X3" at 207.437,195.608 h1
  text "LVDS CH8...15 EEM-1" at 240.005,195.605 h1.02 r90
  text "LVDS CH16...23 EEM-2" at 225.755,195.428 h1.02 r90
  text "SERTX" at 214.913,192.938 h1
  text "SERRX" at 205.23,190.678 h1
  text "CC0" at 212.725,187.96 h1
  text "CC2" at 212.633,182.608 h1
  text "CC1" at 208.128,180.955 h1
  text "MP2" at 232.486,179.807 h1
  text "MP0" at 259.334,179.654 h1
  text "MP1" at 246.253,179.324 h1
  text "CC3" at 207.874,175.844 h1
  text "3.3V" at 207.237,167.792 h1
  text "+3.3" at 213.607,166.675 h1.02
  text "M1" at 204.368,165.756 h1 r90
  text "12V" at 207.899,164.059 h1
  text "M2" at 204.368,163.474 h1 r90
  text "12V" at 211.312,161.256 h1
  text "GND" at 215.628,161.256 h1
Bottom Overlay:
  text "Grabber  v1.1.3" at 238.1,255.473 h1.52
Mechanical1:
  drawing of 303 lines, arcs and shapes, not listed
  text "Layer" at 275.596,230.429 h1.52
  text "Name" at 286.008,230.429 h1.52
  text "Material" at 312.416,230.429 h1.52
  text "Thickness" at 334.254,230.429 h1.52
  text "Constant" at 350.76,230.429 h1.52
  text "Board Layer Stack" at 365.235,230.429 h1.52
  text "TopOverlay" at 286.008,227.381 h1.52
  text "TopSolder" at 286.008,224.333 h1.52
  text "Solder Resist" at 312.416,224.333 h1.52
  text "0.053mm" at 334.254,224.333 h1.52
  text "3.5" at 350.76,224.333 h1.52
  text "1" at 275.596,221.285 h1.52
  text "TopLayer" at 286.008,221.285 h1.52
  text "0.036mm" at 334.254,221.285 h1.52
  text "Dielectric1" at 286.008,218.237 h1.52
  text "FR-4" at 312.416,218.237 h1.52
  text "0.200mm" at 334.254,218.237 h1.52
  text "4.5" at 350.76,218.237 h1.52
  text "2" at 275.596,215.189 h1.52
  text "Internal Plane 2" at 286.008,215.189 h1.52
  text "0.036mm" at 334.254,215.189 h1.52
  text "Dielectric 4" at 286.008,212.141 h1.52
  text "1.000mm" at 334.254,212.141 h1.52
  text "4.5" at 350.76,212.141 h1.52
  text "3" at 275.596,209.093 h1.52
  text "Layer 1" at 286.008,209.093 h1.52
  text "0.036mm" at 334.254,209.093 h1.52
  text "Dielectric 1" at 286.008,206.045 h1.52
  text "FR-4" at 312.416,206.045 h1.52
  text "0.200mm" at 334.254,206.045 h1.52
  text "4.5" at 350.76,206.045 h1.52
  text "4" at 275.596,202.997 h1.52
  text "Bottom Layer" at 286.008,202.997 h1.52
  text "0.036mm" at 334.254,202.997 h1.52
  text "Bottom Solder" at 286.008,199.949 h1.52
  text "Solder Resist" at 312.416,199.949 h1.52
  text "0.053mm" at 334.254,199.949 h1.52
  text "3.5" at 350.76,199.949 h1.52
  text "Bottom Overlay" at 286.008,196.901 h1.52
Mechanical13:
  lines w0.1: 190.648,159.118 190.648,260.1

## Text inside footprints (layer, text, board x,y; h text height)
J1: TopOverlay "25" at 193.6,197.246 h1.02 r90; TopOverlay "12" at 197.41,197.371 h1.02 r90; TopOverlay "13" at 199.315,198.651 h1.02 r90; TopOverlay "26" at 195.505,198.526 h1.02 r90; TopOverlay "14" at 195.5,179.616 h1.02 r90; TopOverlay "15" at 193.595,180.736 h1.02 r90; TopOverlay "2" at 197.405,181.436 h1.02 r90; TopOverlay "1" at 199.31,180.566 h1.02 r90; Mechanical14 "25" at 193.6,197.246 h1.02 r90; Mechanical14 "12" at 197.41,197.371 h1.02 r90; Mechanical14 "13" at 199.315,198.651 h1.02 r90; Mechanical14 "26" at 195.505,198.526 h1.02 r90; Mechanical14 "14" at 195.5,179.616 h1.02 r90; Mechanical14 "15" at 193.595,180.736 h1.02 r90; Mechanical14 "2" at 197.405,181.436 h1.02 r90; Mechanical14 "1" at 199.31,180.566 h1.02 r90
J2: TopOverlay "25" at 193.6,239.246 h1.02 r90; TopOverlay "12" at 197.41,239.371 h1.02 r90; TopOverlay "13" at 199.315,240.651 h1.02 r90; TopOverlay "26" at 195.505,240.526 h1.02 r90; TopOverlay "14" at 195.5,221.616 h1.02 r90; TopOverlay "15" at 193.595,222.736 h1.02 r90; TopOverlay "2" at 197.405,223.436 h1.02 r90; TopOverlay "1" at 199.31,222.566 h1.02 r90; Mechanical14 "25" at 193.6,239.246 h1.02 r90; Mechanical14 "12" at 197.41,239.371 h1.02 r90; Mechanical14 "13" at 199.315,240.651 h1.02 r90; Mechanical14 "26" at 195.505,240.526 h1.02 r90; Mechanical14 "14" at 195.5,221.616 h1.02 r90; Mechanical14 "15" at 193.595,222.736 h1.02 r90; Mechanical14 "2" at 197.405,223.436 h1.02 r90; Mechanical14 "1" at 199.31,222.566 h1.02 r90
J3: TopOverlay "30" at 233.401,191.11 h1.02 r270; Mechanical14 "30" at 233.401,191.11 h1.02 r270
J14: TopOverlay "30" at 261.595,191.11 h1.02 r270; Mechanical14 "30" at 261.595,191.11 h1.02 r270
J24: TopOverlay "30" at 247.498,191.11 h1.02 r270; Mechanical14 "30" at 247.498,191.11 h1.02 r270